# Altium PCB BM20C-V7-LIB.PcbDoc
Units mil, origin at the board's own origin, x right, y up, seen from the top; angles counter-clockwise.
Board outline 6000 x 4000 mil, 6 copper layers (L1, L2, L3, L4, L5, L6), stack 45.9 mil thick; 1 components, 0 nets, 100 pads, 0 vias.
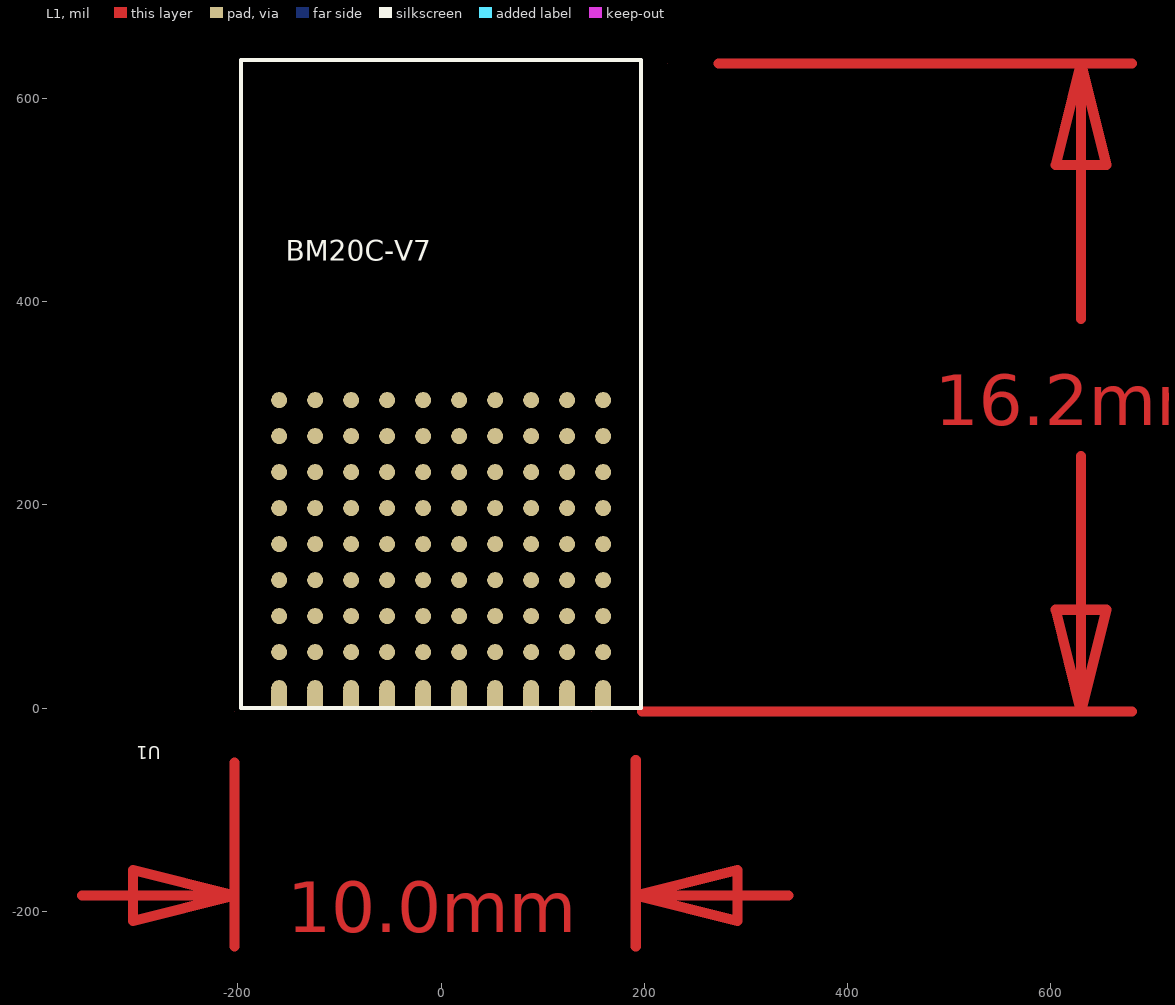
[diagram p0: L1 view]
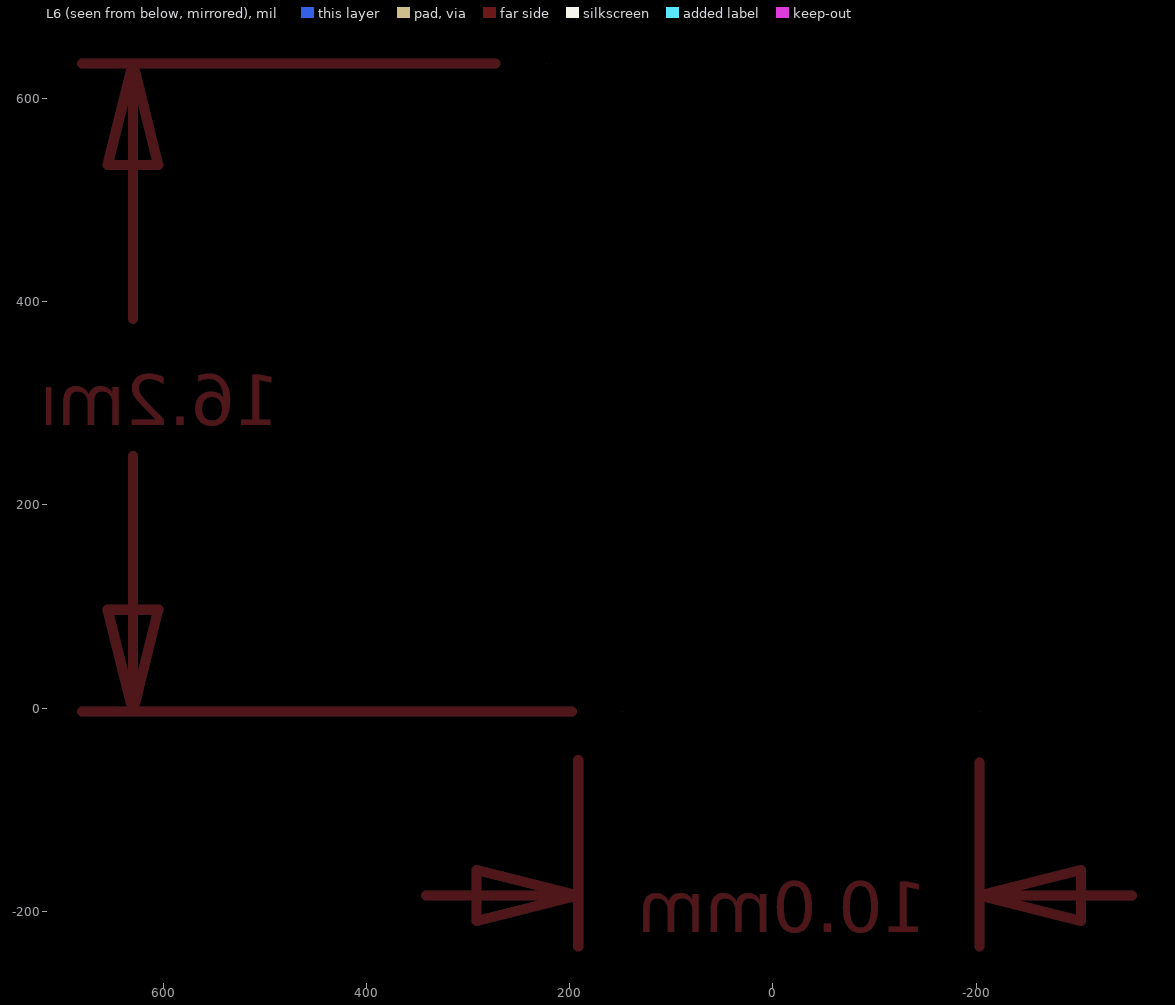
[diagram p1: L6 view, seen from below]

## Layer stack, top to bottom
Solder Mask Top: solder mask 0.4, Solder Resist, Dk 3.5
L1: signal copper 1.4
Dielectric 1: dielectric 3.2, FR-4, Dk 4.3
L2: signal copper 1.4
Dielectric2: dielectric 11.4, FR-4, Dk 4.3
L3: signal copper 1.4
Dielectric3: dielectric 3, FR-4, Dk 4.3
L4: signal copper 1.35
Dielectric4: dielectric 10, FR-4, Dk 4.3
L5: signal copper 1.35
Dielectric5: dielectric 10, FR-4, Dk 4.3
L6: signal copper 1.4
Solder Mask Bottom: solder mask 0.4, Solder Resist, Dk 3.5

## Board outline
-10672.07,-10379.86 -4672.07,-10379.86 -4672.07,-6379.86 -10672.07,-6379.86

## Design rules (kind name [scope] priority, off if disabled: settings)
Clearance "Clearance - Default - DEFAULT- SMD" [IsVia vs IsSMTPin] p1: gap=0 ignorepadtopadclearanceinfootprint=FALSE
Clearance "Clearance - Default - DEFAULT - Via" [IsVia vs IsVia] p2: gap=0 ignorepadtopadclearanceinfootprint=FALSE
Clearance "Clearance - Default - DEFAULT - Net" [All] p3: gap=4 ignorepadtopadclearanceinfootprint=FALSE except(0: Arc-Hole Track-Hole SMDPad-Hole THPad-Hole Via-Hole Fill-Hole Poly-Hole Region-Hole Text-Hole; 3: Arc-SMDPad Arc-THPad Arc-Via Track-SMDPad Track-THPad Track-Via SMDPad-SMDPad SMDPad-THPad SMDPad-Via THPad-THPad THPad-Via Via-Via; 5: Fill-Fill Fill-Poly Fill-Region Poly-Poly Poly-Region Region-Region; 10: Text-Text)
ComponentClearance "ComponentClearance - Default - DEFAULT" [All] p1: gap=0 collisioncheckmode=3 verticalgap=10 showdistances=FALSE
HoleToHoleClearance "HoleToHoleClearance - Default - DEFAULT" [All] p1: gap=0 allowstackedmicrovias=TRUE
Length "Default Length" [All] p1: maxlimit=50000 minlimit=0
MaxMinImpedance "Default Impedance" [All] p1: minimum=50.00 maximum=150.0
ParallelSegment "Default Parallel Segment Same Layer" [All] p1: limit=1000 gap=200
ParallelSegment "Default Parallel Segment Adjasent" [All] p2: limit=1000 gap=200
PlaneConnect "Default PlaneConnect" [All] p1: planeconnectstyle=Direct reliefexpansion=20 reliefentries=4 reliefconductorwidth=5 reliefairgap=10
PolygonConnect "PolygonConnect - Default SMT" [IsSMTPin] p1: connectstyle=Direct reliefconductorwidth=5 reliefentries=4 polygonreliefangle="45 Angle" airgapwidth=10
PolygonConnect "PolygonConnect - Default Pad" [All] p2: connectstyle=Direct reliefconductorwidth=5 reliefentries=4 polygonreliefangle="45 Angle" airgapwidth=10
RoutingLayers "RoutingLayers - Default - DEFAULT" [All] p1: top layer_v5=TRUE mid layer 1_v5=TRUE mid layer 2_v5=TRUE mid layer 3_v5=TRUE mid layer 4_v5=TRUE bottom layer_v5=TRUE
RoutingPriority "RoutingPriority - Default - DEFAULT" [All] p1: routingpriority=3
RoutingTopology "Default Routing Topology" [All] p1: topology=Shortest
RoutingVias "RoutingVias - Default - DEFAULT" [All] p1: holewidth=5 width=10 viastyle="Through Hole" minholewidth=5 minwidth=10 maxholewidth=5 maxwidth=10
SMDToCorner "SMDToCorner - Default - DEFAULT" [All] p1: distance=0
SolderMaskExpansion "SolderMaskExpansion from CAM settings" [All] p1: expansion=5
Width "Default Width" [All] p1: maxlimit=120 minlimit=3 preferedwidth=5
24 further rules are at their usual default settings.

## Components (designator, comment, footprint, x,y, rotation, side; value= is the part's Value field where it differs from the comment)
U1 "BM20-C" BM20-C 0,196.85 r270 top

## Footprints (in the part's own frame and the unit in brackets; to place one, negate y for a bottom-side part, rotate by r counter-clockwise, add the part's x,y. Pads: shape width x height; smd on the part's side, far side on the other; paste and mask are expansions set on the pad)
BM20-C [mm]
  round 0.4 smd: A1(-2.7,-4.05) A2(-1.8,-4.05) A3(-0.9,-4.05) A4(0,-4.05) A5(0.9,-4.05) A6(1.8,-4.05) A7(2.7,-4.05) A8(3.6,-4.05) A9(4.5,-4.05) B1(-2.7,-3.15) B2(-1.8,-3.15) B3(-0.9,-3.15) B4(0,-3.15) B5(0.9,-3.15) B6(1.8,-3.15) B7(2.7,-3.15) B8(3.6,-3.15) B9(4.5,-3.15) C1(-2.7,-2.25) C2(-1.8,-2.25) C3(-0.9,-2.25) C4(0,-2.25) C5(0.9,-2.25) C6(1.8,-2.25) C7(2.7,-2.25) C8(3.6,-2.25) C9(4.5,-2.25) D1(-2.7,-1.35) D2(-1.8,-1.35) D3(-0.9,-1.35) D4(0,-1.35) D5(0.9,-1.35) D6(1.8,-1.35) D7(2.7,-1.35) D8(3.6,-1.35) D9(4.5,-1.35) E1(-2.7,-0.45) E2(-1.8,-0.45) E3(-0.9,-0.45) E4(0,-0.45) E5(0.9,-0.45) E6(1.8,-0.45) E7(2.7,-0.45) E8(3.6,-0.45) E9(4.5,-0.45) F1(-2.7,0.45) F2(-1.8,0.45) F3(-0.9,0.45) F4(0,0.45) F5(0.9,0.45) F6(1.8,0.45) F7(2.7,0.45) F8(3.6,0.45) F9(4.5,0.45) G1(-2.7,1.35) G2(-1.8,1.35) G3(-0.9,1.35) G4(0,1.35) G5(0.9,1.35) G6(1.8,1.35) G7(2.7,1.35) G8(3.6,1.35) G9(4.5,1.35) H1(-2.7,2.25) H2(-1.8,2.25) H3(-0.9,2.25) H4(0,2.25) H5(0.9,2.25) H6(1.8,2.25) H7(2.7,2.25) H8(3.6,2.25) H9(4.5,2.25) J1(-2.7,3.15) J2(-1.8,3.15) J3(-0.9,3.15) J4(0,3.15) J5(0.9,3.15) J6(1.8,3.15) J7(2.7,3.15) J8(3.6,3.15) J9(4.5,3.15) K1(-2.7,4.05) K2(-1.8,4.05) K3(-0.9,4.05) K4(0,4.05) K5(0.9,4.05) K6(1.8,4.05) K7(2.7,4.05) K8(3.6,4.05) K9(4.5,4.05)
  rect 0.4x0.4 smd: P(4.75,-4.05) P1(4.75,-3.15) P2(4.75,-2.25) P3(4.75,-1.35) P4(4.75,-0.45) P5(4.75,0.45) P6(4.75,1.35) P7(4.75,2.25) P8(4.75,3.15) P9(4.75,4.05)
  silkscreen extent -11.2,-5 5,5

## Nets (pads, with @x,y where several pads share a name; then routed paths per layer and width w, separated by ;. In a path a pad name is that pad's centre, name@x,y a point inside that pad or via, vN(x,y) a via of type N, cw(c..) or ccw(c..) an arc to the next point about the centre after c; other vN are vias at no path point)
pads on no net: U1.A1 U1.A2 U1.A3 U1.A4 U1.A5 U1.A6 U1.A7 U1.A8 U1.A9 U1.B1 U1.B2 U1.B3 U1.B4 U1.B5 U1.B6 U1.B7 U1.B8 U1.B9 U1.C1 U1.C2 U1.C3 U1.C4 U1.C5 U1.C6 U1.C7 U1.C8 U1.C9 U1.D1 U1.D2 U1.D3 U1.D4 U1.D5 U1.D6 U1.D7 U1.D8 U1.D9 U1.E1 U1.E2 U1.E3 U1.E4 U1.E5 U1.E6 U1.E7 U1.E8 U1.E9 U1.F1 U1.F2 U1.F3 U1.F4 U1.F5 U1.F6 U1.F7 U1.F8 U1.F9 U1.G1 U1.G2 U1.G3 U1.G4 U1.G5 U1.G6 U1.G7 U1.G8 U1.G9 U1.H1 U1.H2 U1.H3 U1.H4 U1.H5 U1.H6 U1.H7 U1.H8 U1.H9 U1.J1 U1.J2 U1.J3 U1.J4 U1.J5 U1.J6 U1.J7 U1.J8 U1.J9 U1.K1 U1.K2 U1.K3 U1.K4 U1.K5 U1.K6 U1.K7 U1.K8 U1.K9 U1.P U1.P1 U1.P2 U1.P3 U1.P4 U1.P5 U1.P6 U1.P7 U1.P8 U1.P9
copper on no net: | length 3080.8
  L1 w10: -353.46,-184.5 -203.46,-184.5 ; -203.46,-234.5 -203.46,-53.58 ; 191.55,-234.5 191.55,-51.2 ; 197.74,-3.26 679.9,-3.26 ; 272.99,634.53 679.9,634.53 ; 341.55,-184.5 191.55,-184.5 ; 629.9,248.13 629.9,-3.26 ; 629.9,383.13 629.9,634.53 ; -203.46,-184.5 -303.46,-159.5 -303.46,-209.5 -203.46,-184.5 ; 191.55,-184.5 291.55,-209.5 291.55,-159.5 191.55,-184.5 ; 629.9,-3.26 654.9,96.74 604.9,96.74 629.9,-3.26 ; 629.9,634.53 604.9,534.53 654.9,534.53 629.9,634.53

## Other copper
L1:
  text "16.2mm" at 485.59,278.13 h50
  text "10.0mm" at -151.63,-220.82 h50

## Silkscreen, mask and mechanical layers (free items; w line width, h text height)
Silkscreen Top:
  text "BM20C-V7" at -153.15,440.09 h20